# Altium PCB PCB.PcbDoc
Units mm, origin at the board's own origin, x right, y up, seen from the top; angles counter-clockwise.
Board outline 70 x 80 mm, 2 copper layers (Top Layer, Bottom Layer); 88 components, 64 nets, 298 pads, 158 vias.
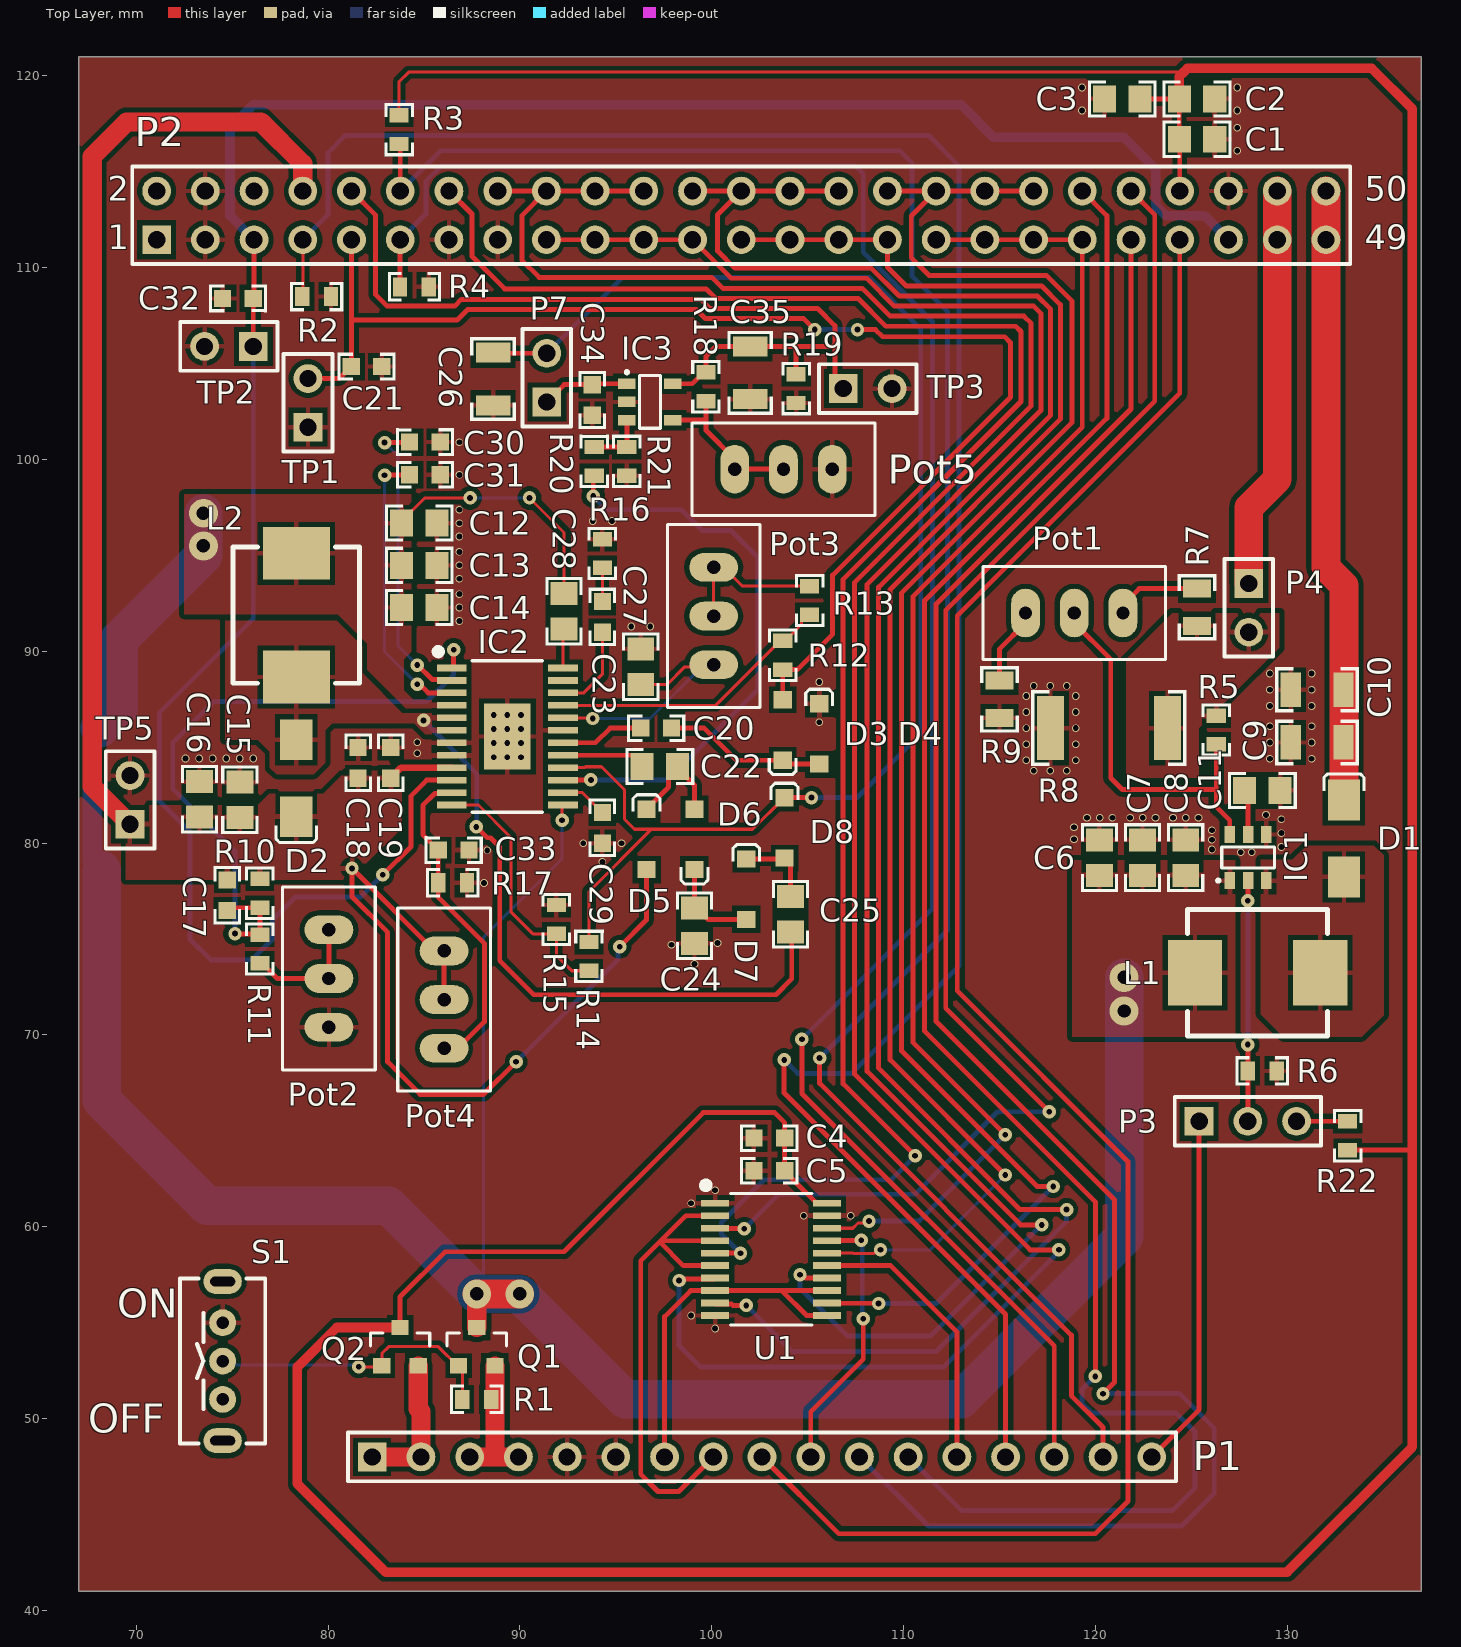
[diagram p0: Top Layer view]
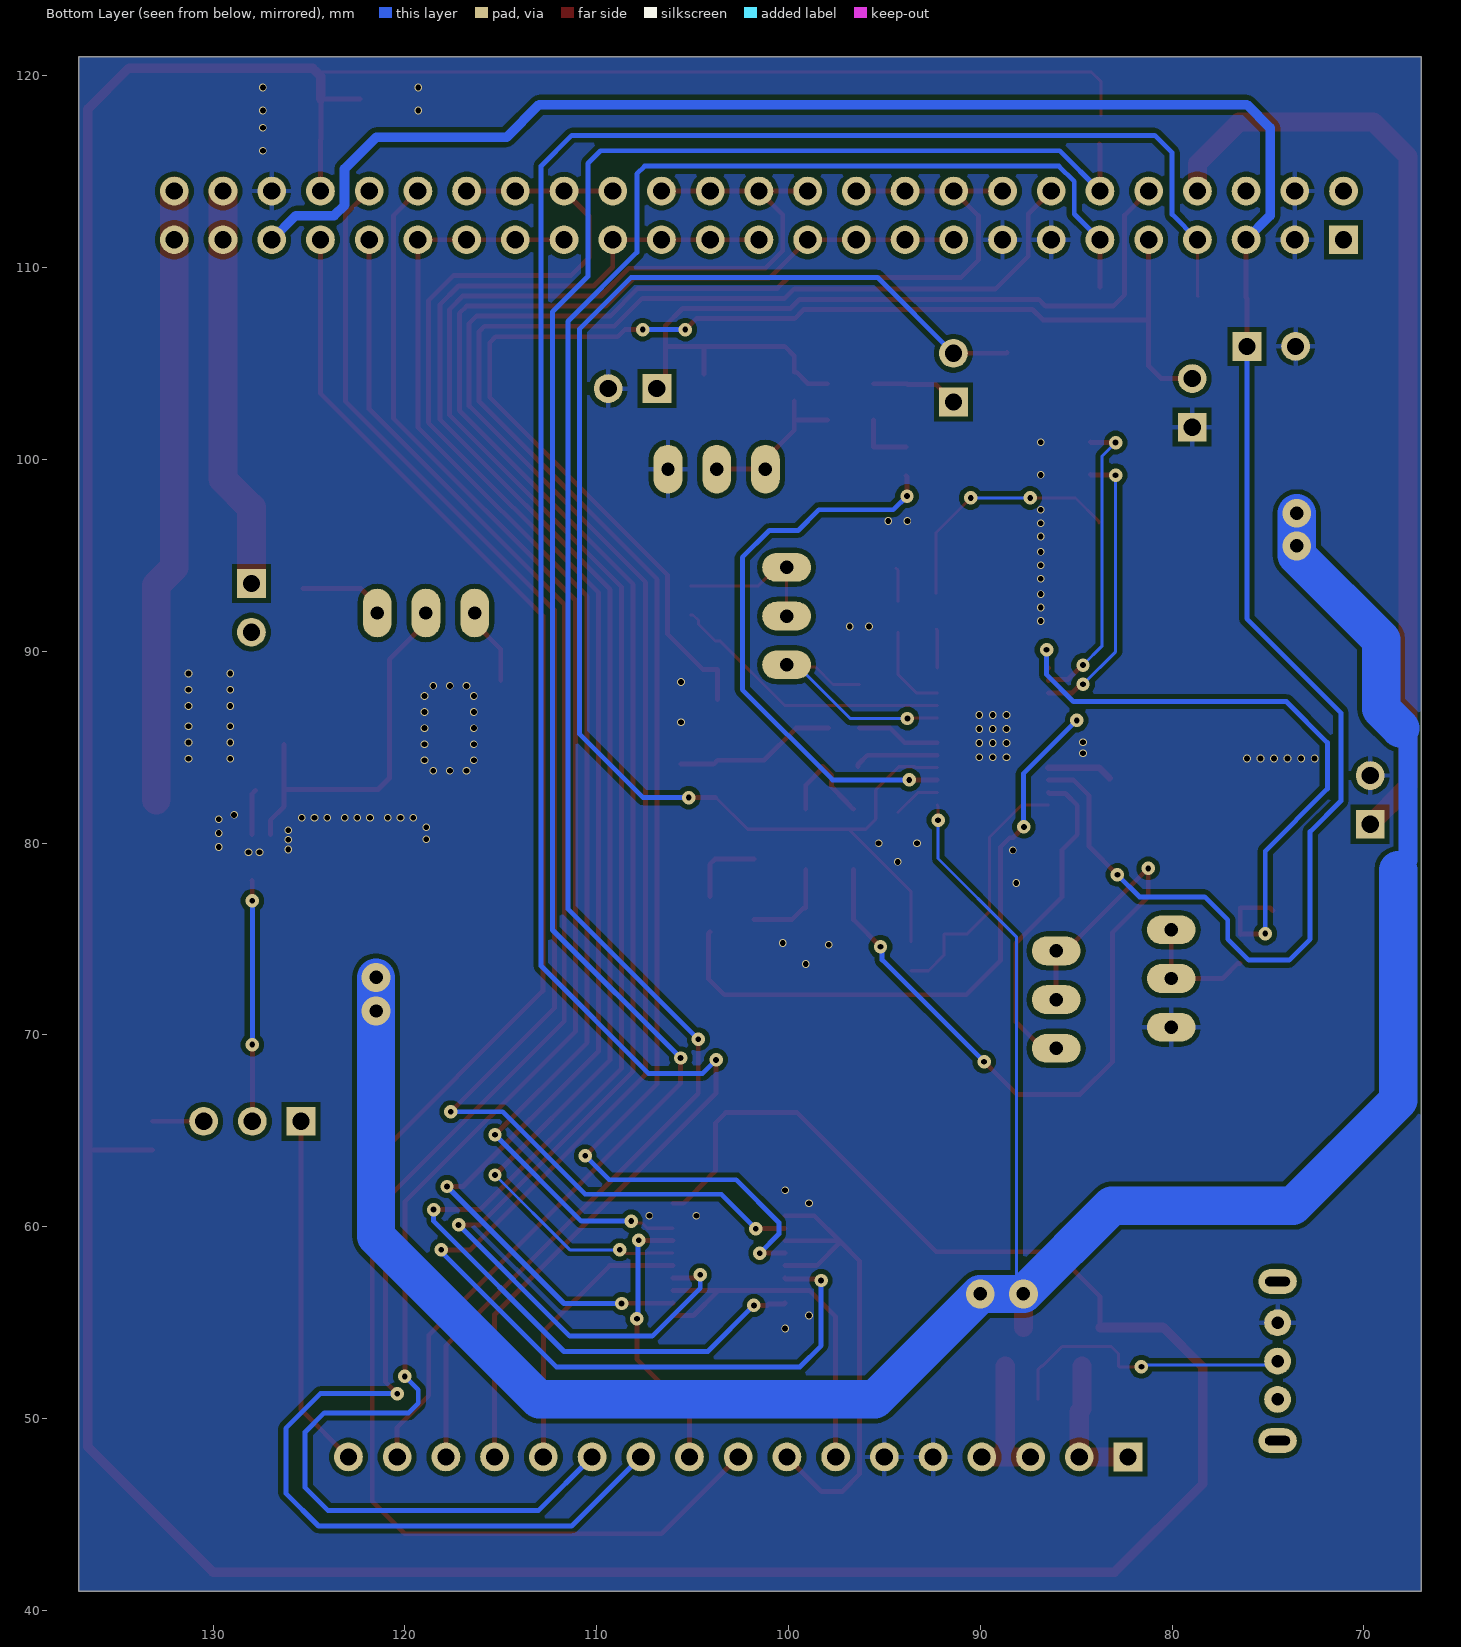
[diagram p1: Bottom Layer view, seen from below]
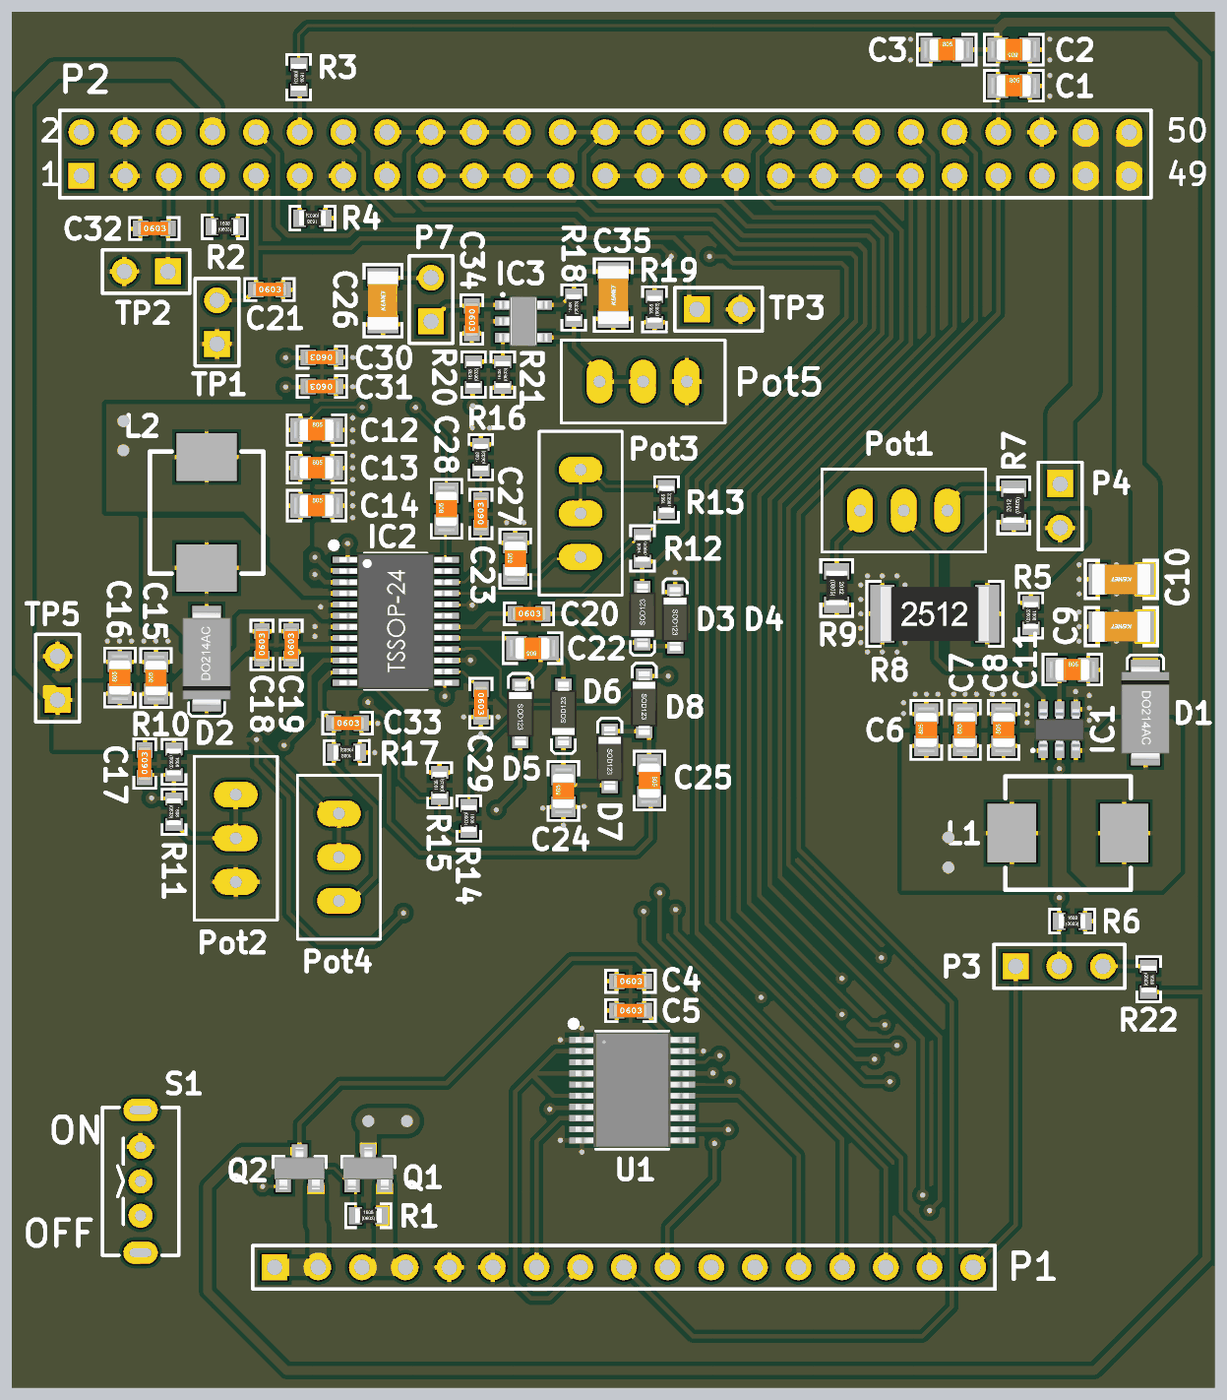
[diagram p2: 3D render of the assembled board from above, using the file's embedded part models]

## Layer stack, top to bottom
Top Solder: solder mask 0.0102, Solder Resist, Dk 3.5
Top Layer: signal copper 0.0356
Dielectric 1: dielectric 0.32, FR-4, Dk 4.8
Bottom Layer: signal copper 0.0356
Bottom Solder: solder mask 0.0102, Solder Resist, Dk 3.5

## Board outline
67,41 137,41 137,121 67,121

## Design rules (kind name [scope] priority, off if disabled: settings)
Clearance [All] p1: gap=0.254 ignorepadtopadclearanceinfootprint=FALSE
PolygonConnect [All] p1: connectstyle=Relief reliefconductorwidth=0.254 reliefentries=4 polygonreliefangle="90 Angle" airgapwidth=0.254
RoutingVias [All] p1: holewidth=0.3 width=0.7 viastyle="Through Hole" minholewidth=0.3 minwidth=0.4 maxholewidth=1.5 maxwidth=2
SolderMaskExpansion [All] p1: expansion=0.102 istentingtop=FALSE
SupplyNets "Schematic Supply Nets_5" [InNet('GND')] p1: voltage=0.000
SupplyNets "Schematic Supply Nets_4" [InNet('Vdd_5V_LCD')] p2: voltage=0.000
SupplyNets "Schematic Supply Nets_3" [InNet('Vdd_5V')] p3: voltage=0.000
SupplyNets "Schematic Supply Nets_1" [InNet('FPC_PIN7')] p4: voltage=0.000
SupplyNets "Schematic Supply Nets" [InNet('Vdd_3.3V')] p5: voltage=0.000
Width [All] p1: maxlimit=2.5 minlimit=0.16 preferedwidth=0.254
30 further rules are at their usual default settings.

## Classes and differential pairs
component class LCD_RGB_parallel_connector: C1 C2 C3 C4 C5 P1 P2 Q1 Q2 R1 R2 R3 R4 S1 U1
component class LCD_power_supplies: C12 C13 C14 C15 C16 C17 C18 C19 C20 C21 C22 C23 C24 C25 C26 C27 C28 C29 C30 C31 C32 C33 C34 C35 D2 D3 D4 D5 D6 D7 D8 IC2 IC3 L2 P7 Pot2 Pot3 Pot4 R10 R11 R12 R13 R14 R15 R16 R17 R18 R19 R20 R21 TP1 TP2 TP3 TP5
component class LCD_backlight_power: C6 C7 C8 C9 C10 C11 D1 IC1 L1 P3 P4 Pot1 R5 R6 R7 R8 R9 R22

## Components (designator, comment, footprint, x,y, rotation, side; value= is the part's Value field where it differs from the comment)
C1 "ceramic capacitor" "capacitor 0805" 125.3,116.7 r0 top value=100nF
C2 "ceramic capacitor" "capacitor 0805" 125.3,118.8 r180 top value=22uF
C3 "ceramic capacitor" "capacitor 0805" 121.4,118.8 r0 top value=22uF
C4 "ceramic capacitor" "capacitor 0603" 103,64.625 r0 top value=10uF
C5 "Ceramic capacitor" "capacitor 0603" 103,62.925 r0 top value=100nF
C6 "ceramic capacitor" "capacitor 0805" 120.21,79.25 r90 top value=10uF
C7 "ceramic capacitor" "capacitor 0805" 122.46,79.25 r90 top value=10uF
C8 "ceramic capacitor" "capacitor 0805" 124.71,79.25 r90 top value=100nF
C9 "ceramic capacitor" "capacitor 1206" 131.56,85.25 r180 top value=4.7uF
C10 "ceramic capacitor" "capacitor 1206" 131.56,88 r180 top value=4.7uF
C11 "ceramic capacitor" "capacitor 0805" 128.71,82.75 r0 top value=220nF
C12 "ceramic capacitor" "capacitor 0805" 84.744,96.686 r0 top value=22uF
C13 "ceramic capacitor" "capacitor 0805" 84.744,94.486 r0 top value=22uF
C14 "ceramic capacitor" "capacitor 0805" 84.744,92.286 r0 top value=100nF
C15 "ceramic capacitor" "capacitor 0805" 75.398,82.265 r90 top value=22uF
C16 "ceramic capacitor" "capacitor 0805" 73.298,82.29 r90 top value=22uF
C17 "ceramic capacitor" "capacitor 0603" 74.744,77.286 r90 top value=270pF
C18 "ceramic capacitor" "capacitor 0603" 81.563,84.19 r90 top value=1uF
C19 "ceramic capacitor" "capacitor 0603" 83.263,84.19 r90 top value=100nF
C20 "ceramic capacitor" "capacitor 0603" 97.1,86 r0 top value=470nF
C21 "ceramic capacitor" "capacitor 0603" 82,104.85 r0 top value=2.2uF
C22 "ceramic capacitor" "capacitor 0805" 97.3,84 r180 top value=1uF
C23 "ceramic capacitor" "capacitor 0805" 96.3,89.2 r90 top value=220nF
C24 "ceramic capacitor" "capacitor 0805" 99.1,75.7 r90 top value=2.2uF
C25 "ceramic capacitor" "capacitor 0805" 104.1,76.3 r270 top value=1uF
C26 "ceramic capacitor" "capacitor 1206" 88.6,104.2 r90 top value=4.7uF
C27 "ceramic capacitor" "capacitor 0603" 94.3,91.8 r90 top value=2.2nF
C28 "ceramic capacitor" "capacitor 0805" 92.3,92.1 r90 top value=220nF
C29 "ceramic capacitor" "capacitor 0603" 94.3,80.8 r270 top value=22pF
C30 "ceramic capacitor" "capacitor 0603" 85.048,100.913 r180 top value=22nF
C31 "ceramic capacitor" "capacitor 0603" 85.048,99.213 r180 top value=22nF
C32 "ceramic capacitor" "capacitor 0603" 75.3,108.4 r0 top value=2.2uF
C33 "ceramic capacitor" "capacitor 0603" 86.544,79.64 r0 top value=100nF
C34 "ceramic capacitor" "capacitor 0603" 93.773,103.104 r270 top value=100nF
C35 "ceramic capacitor" "capacitor 1206" 102,104.525 r90 top value=4.7uF
D1 "D Schottky" DO-214AC 132.96,80.25 r270 top
D2 "D Schottky" DO-214AC 78.344,83.386 r90 top
D3 "D Schottky" SOD123 103.7,85.9 r90 top
D4 "D Schottky" SOD123 105.6,85.7 r270 top
D5 "D Schottky" SOD123 96.6,80.2 r270 top
D6 "D Schottky" SOD123 99.1,80.2 r90 top
D7 "D Schottky" SOD123 101.8,77.6 r270 top
D8 "D Schottky" SOD123 103.8,80.8 r270 top
IC1 "TPS61165" "sot-23 (6)" 127.96,79.25 r270 top
IC2 "TPS65150" TSSOP24-Thermal_pad 86.444,81.986 r0 top
IC3 "MIC5235YM5" "sot-23 (5)" 96.773,103.004 r180 top
L1 "Inductor" "Inductor SMD 6.6 x 7.3 x 4" 128.46,73.25 r0 top value=22uH
L2 "Inductor" "Inductor SMD 6.6 x 7.1 x 3" 78.344,91.886 r270 top value=4.7uH
P1 "Header 17" HDR1X17 82.3,48 r0 top
P2 "Header 25X2" HDR2X25 71.06,111.46 r0 top
P3 "Header 3" HDR1X3 125.41,65.5 r0 top
P4 "Header 2" HDR1X2 128,93.54 r270 top
P7 "Header 2" HDR1X2 91.4,103 r90 top
Pot1 "Multiturn" "trim pot 3296W" 118.9,92 r180 top value=1k
Pot2 "Multiturn" "trim pot 3296W" 80.044,72.946 r90 top value=5k
Pot3 "Multiturn" "trim pot 3296W" 100.1,91.84 r90 top value=50k
Pot4 "Multiturn" "trim pot 3296W" 86.044,71.846 r90 top value=100k
Pot5 "Multiturn" "trim pot 3296W" 103.74,99.5 r180 top value=20k
Q1 "SI2301" sot-23 87.75,53.75 r270 top
Q2 "SI2301" sot-23 83.75,53.75 r270 top
R1 "Resistor" "resistor 0603" 87.75,51 r0 top value=100k
R2 "Resistor" "resistor 0603" 79.4,108.5 r0 top value=10k
R3 "Resistor" "resistor 0603" 83.7,117.2 r270 top value=10k
R4 "Resistor" "resistor 0603" 84.5,109 r180 top value=10k
R5 "Resistor" "resistor 0603" 126.3,85.9 r270 top value=5.6k
R6 "Resistor" "resistor 0603" 128.7,68.125 r0 top value=100k
R7 "Resistor" "resistor 0805" 125.3,92.3 r90 top value=120
R8 "Resistor" "resistor 2512" 120.71,86 r0 top value=2.2
R9 "Resistor" "resistor 0805" 115,87.5 r270 top value=330
R10 "Resistor" "resistor 0603" 76.444,77.386 r270 top value=56K
R11 "Resistor" "resistor 0603" 76.444,74.486 r270 top value=4.7K
R12 "Resistor" "resistor 0603" 103.7,89.8 r90 top value=390k
R13 "Resistor" "resistor 0603" 105.1,92.65 r90 top value=56k
R14 "Resistor" "resistor 0603" 93.6,74.1 r270 top value=820k
R15 "Resistor" "resistor 0603" 91.9,76.025 r90 top value=47k
R16 "Resistor" "resistor 0603" 94.3,95.1 r90 top value=0
R17 "Resistor" "resistor 0603" 86.494,77.94 r180 top value=39k
R18 "Resistor" "resistor 0603" 99.7,103.8 r90 top value=120k
R19 "Resistor" "resistor 0603" 104.4,103.7 r90 top value=47k
R20 "Resistor" "resistor 0603" 93.873,99.904 r90 top value=1k
R21 "Resistor" "resistor 0603" 95.573,99.904 r90 top value=100k
R22 "Resistor" "resistor 0603" 133.15,64.75 r270 top value=1k
S1 "SW-SPDT" "Slide switch 2mm pitch" 74.5,53 r90 top
TP1 "Header 2" HDR1X2 78.95,101.685 r90 top
TP2 "Header 2" HDR1X2 76.1,105.9 r180 top
TP3 "Header 2" HDR1X2 106.86,103.7 r0 top
TP5 "Header 2" HDR1X2 69.673,80.987 r90 top
U1 "SN74LVC244APWR" PW20 103.1,58.3 r0 top

## Footprints (in the part's own frame and the unit in brackets; to place one, negate y for a bottom-side part, rotate by r counter-clockwise, add the part's x,y. Pads: shape width x height; smd on the part's side, far side on the other; paste and mask are expansions set on the pad)
"capacitor 0603" [mm] "capacitor 0603 1.6mm x 0.8mm"
  rect 0.9x0.9 smd: 1(-0.8,0) 2(0.8,0)
  silkscreen extent -1.52,-0.72 1.52,0.72, body extent -1,-0.39 1,0.39, height 0.8
"capacitor 0805" [mm] "capacitor 0805 2mm x 1.25mm"
  rect 1.2x1.4 smd: 1(-0.925,0) 2(0.925,0)
  silkscreen extent -1.79,-0.97 1.79,0.97, body extent -1.3,-0.62 1.3,0.63, height 0.78
"capacitor 1206" [mm] "capacitor SMD 1206 3.2mm x 1.6mm"
  rect 1.05x1.8 smd: 1(-1.375,0) 2(1.375,0)
  silkscreen extent -2.19,-1.19 2.19,1.19, body extent -1.69,-0.9 1.71,0.9, height 0.88
DO-214AC [mm] "DO-214AC 4.5mm x 2.8mm"
  rect 2.13x1.68 smd: 1(2.005,0) 2(-2.005,0)
  silkscreen extent -3.35,-1.13 -2.47,1.13, body extent -2.74,-1.4 2.74,1.4, height 2.26
HDR1X2 [mm] "Connector; Header; 2 Position"
  rect 1.5x1.5 hole 0.9: 1(0,0)
  round 1.5 hole 0.9: 2(2.54,0)
  silkscreen extent -1.27,-1.27 3.81,1.27
HDR1X3 [mm] "Connector; Header; 3 Position"
  rect 1.5x1.5 hole 0.9: 1(0,0)
  round 1.5 hole 0.9: 2(2.54,0) 3(5.08,0)
  silkscreen extent -1.27,-1.27 6.35,1.27
HDR1X17 [mm] "Connector; Header; 17 Position"
  rect 1.5x1.5 hole 0.9: 1(0,0)
  round 1.5 hole 0.9: 2(2.54,0) 3(5.08,0) 4(7.62,0) 5(10.16,0) 6(12.7,0) 7(15.24,0) 8(17.78,0) 9(20.32,0) 10(22.86,0) 11(25.4,0) 12(27.94,0) 13(30.48,0) 14(33.02,0) 15(35.56,0) 16(38.1,0) 17(40.64,0)
  silkscreen extent -1.27,-1.27 41.91,1.27
HDR2X25 [mm] "Connector; Header; 25x2 Position"
  rect 1.5x1.5 hole 0.9: 1(0,0)
  round 1.5 hole 0.9: 2(0,2.54) 3(2.54,0) 4(2.54,2.54) 5(5.08,0) 6(5.08,2.54) 7(7.62,0) 8(7.62,2.54) 9(10.16,0) 10(10.16,2.54) 11(12.7,0) 12(12.7,2.54) 13(15.24,0) 14(15.24,2.54) 15(17.78,0) 16(17.78,2.54) 17(20.32,0) 18(20.32,2.54) 19(22.86,0) 20(22.86,2.54) 21(25.4,0) 22(25.4,2.54) 23(27.94,0) 24(27.94,2.54) 25(30.48,0) 26(30.48,2.54) 27(33.02,0) 28(33.02,2.54) 29(35.56,0) 30(35.56,2.54) 31(38.1,0) 32(38.1,2.54) 33(40.64,0) 34(40.64,2.54) 35(43.18,0) 36(43.18,2.54) 37(45.72,0) 38(45.72,2.54) 39(48.26,0) 40(48.26,2.54) 41(50.8,0) 42(50.8,2.54) 43(53.34,0) 44(53.34,2.54) 45(55.88,0) 46(55.88,2.54) 47(58.42,0) 48(58.42,2.54) 49(60.96,0) 50(60.96,2.54)
  silkscreen extent -1.27,-1.27 62.23,3.81
"Inductor SMD 6.6 x 7.1 x 3" [mm] "6.6mm x 7.1mm x 3mm"
  rect 2.75x3.5 smd: 1(-3.225,0) 2(3.225,0)
  silkscreen extent -3.55,-3.3 3.55,3.3, body extent -3.55,-3.3 3.55,3.3, height 3
"Inductor SMD 6.6 x 7.3 x 4" [mm] "6.6mm x 7.3mm x 4mm"
  rect 2.83x3.4 smd: 1(-3.265,0) 2(3.265,0)
  silkscreen extent -3.65,-3.3 3.65,3.3, body extent -3.65,-3.3 3.65,3.3, height 3
PW20 [mm]
  rect 1.462x0.355 smd paste+0 mask+0: 1(-2.921,2.925) 2(-2.921,2.275) 3(-2.921,1.625) 4(-2.921,0.975) 5(-2.921,0.325) 6(-2.921,-0.325) 7(-2.921,-0.975) 8(-2.921,-1.625) 9(-2.921,-2.275) 10(-2.921,-2.925) 11(2.921,-2.925) 12(2.921,-2.275) 13(2.921,-1.625) 14(2.921,-0.975) 15(2.921,-0.325) 16(2.921,0.325) 17(2.921,0.975) 18(2.921,1.625) 19(2.921,2.275) 20(2.921,2.925)
  silkscreen extent -3.51,-3.43 2.13,3.96, body extent -3.3,-3.3 3.3,3.3, height 1.2
"resistor 0603" [mm] "resistor SMD 0.0625W 0603 1.6mm x 0.8mm"
  rect 0.75x1 smd: 1(-0.75,0) 2(0.75,0)
  silkscreen extent -1.39,-0.77 1.39,0.77, body extent -0.77,-0.42 0.78,0.43, height 0.45
"resistor 0805" [mm] "resistor SMD 0.1W 0805 2mm x 1.25mm"
  rect 0.95x1.45 smd: 1(-0.975,0) 2(0.975,0)
  silkscreen extent -1.74,-1.01 1.74,1.01, body extent -1,-0.62 1,0.63, height 0.45
"resistor 2512" [mm] "resistor SMD 2512 6.35mm x 3.1mm"
  rect 1.4x3.35 smd: 1(-3.05,0) 2(3.05,0)
  silkscreen extent -4.06,-1.98 4.05,1.98, body extent -3.15,-1.57 3.15,1.58, height 0.82
"Slide switch 2mm pitch" [mm] "slide switch 3 pins, 2mm pitch"
  round 1.4 / inner round 1.7 / far side round 1.4 hole 0.65: 1(-2,0) 2(0,0) 3(2,0)
  oval 1.3x2 hole 0.5 slot 1.3 at 90 deg: ""(-4.15,0) ""(4.15,0)
  silkscreen extent -4.3,-2.22 4.3,2.22
SOD123 [mm] "SOD123"
  rect 0.9x0.95 smd: 1(1.575,0) 2(-1.575,0)
  silkscreen extent -2.33,-0.78 -1.45,0.78, body extent -1.85,-0.77 1.85,0.77, height 1.35
sot-23 [mm] "sot-23"
  rect 0.8x0.9 smd: 1(1,-0.95) 2(1,0.95) 3(-1,0)
  silkscreen extent -0.71,-1.55 -0.05,1.55, body extent -1.21,-1.45 1.21,1.45, height 0.98
"sot-23 (5)" [mm] "sot-23 (5)"
  rect 0.9x0.55 smd: 1(1.2,-0.95) 2(1.2,0) 3(1.2,0.95) 4(-1.2,0.95) 5(-1.2,-0.95)
  silkscreen extent -0.55,-1.6 1.25,1.37, body extent -1.4,-1.45 1.4,1.45, height 1.1
"sot-23 (6)" [mm] "sot-23 (6)"
  rect 0.9x0.55 smd: 1(1.2,-0.95) 2(1.2,0) 3(1.2,0.95) 4(-1.2,0.95) 5(-1.2,0) 6(-1.2,-0.95)
  silkscreen extent -0.55,-1.6 1.25,1.37, body extent -1.2,-1.45 1.2,1.45, height 1.08
"trim pot 3296W" [mm] "9.6 x 9.6mm"
  oval 1.5x2.54 hole 0.7: 1(-2.54,0) 2(0,0) 3(2.54,0)
  silkscreen extent -4.76,-2.41 4.76,2.41
TSSOP24-Thermal_pad [mm] "TSSOP24 with thermal pad"
  rect 1.55x0.35 smd: 1(0,7.15) 2(0,6.5) 3(0,5.85) 4(0,5.2) 5(0,4.55) 6(0,3.9) 7(0,3.25) 8(0,2.6) 9(0,1.95) 10(0,1.3) 11(0,0.65) 12(0,0) 13(5.8,0) 14(5.8,0.65) 15(5.8,1.3) 16(5.8,1.95) 17(5.8,2.6) 18(5.8,3.25) 19(5.8,3.9) 20(5.8,4.55) 21(5.8,5.2) 22(5.8,5.85) 23(5.8,6.5) 24(5.8,7.15)
  rect 2.44x3.42 smd: 25(2.9,3.575)
  silkscreen extent -0.87,-0.38 4.72,8.17, body extent -0.38,-0.37 6.18,7.53, height 1.19

## Part data
C1 C8 C14: "Multilayer ceramic capacitor", LCSC part=C1711, Package=0805, V=50
  C8 C14: Material=X7R
C2 C3: "Multilayer ceramic capacitor", LCSC part=C45783, Package=0805, V=25
C4: "Multilayer ceramic capacitor", LCSC part=C1691, Package=0603, V=6.3
C5: "Multilayer ceramic capacitor", LCSC part=C14663, Package=0603, V=50
C6 C7: "Multilayer ceramic capacitor", LCSC part=C15850, Package=0805, Material=X5R, V=25
C9 C10: "Multilayer ceramic capacitor", LCSC part=C51205, Package=1206, Material=X7R, V=50V
C11 C23 C28: "Multilayer ceramic capacitor", LCSC part=C5153, Package=0805, Material=X7R
  C11: V=25
  C23 C28: V=25V
C12 C13 C15 C16: "Multilayer ceramic capacitor", LCSC part=C602037, Package=0805, Material=X5R, V=25
C17: "Multilayer ceramic capacitor", LCSC part=C472789, Package=0603, Material=C0G, V=50V
C18: "Multilayer ceramic capacitor", LCSC part=C29936, Package=0603, Material=X7R, V=25
C19 C33 C34: "Multilayer ceramic capacitor", LCSC part=C1591, Package=0603, Material=X7R, V=50
C20: "Multilayer ceramic capacitor", LCSC part=C472773, Package=0603, Material=X7R, V=25V
C21 C32: "Multilayer ceramic capacitor", LCSC part=C57895, Package=0603, Material=X5R, V=25V
C22 C25: "Multilayer ceramic capacitor", LCSC part=C77083, Package=0805, Material=X7R, V=50V
C24: "Multilayer ceramic capacitor", LCSC part=C2762602, Package=0805, Material=X7R, V=50V
C26 C35: "Multilayer ceramic capacitor", LCSC part=C307575, Package=1206, Material=X7R, V=50V
C27: "Multilayer ceramic capacitor", LCSC part=C343869, Package=0603, Material=C0G, V=50V
C29: "Multilayer ceramic capacitor", LCSC part=C1653, Package=0603, Material=C0G, V=50V
C30 C31: "Multilayer ceramic capacitor", LCSC part=C21122, Package=0603, Material=X7R, V=50V
D1 D2: "Schottky Diode", current=2A, LCSC part=C511359, MFR="Vishay Intertech", MFR part=SS26SHE3_B/H, Package=SMA(DO-214AC), voltage=60V
D3 D4 D5 D6 D7 D8: "Schottky Diode", current=500mA, LCSC part=C21353, MFR=onsemi, MFR part=MBR0540T1G, Package=SOD-123, voltage=40V
IC1: "LED Backlighting for LCD display", LCSC part=C58756, MFR="Texas Instruments", MFR part=TPS61165DBVR, Package=SOT-23-6
IC2: "LCD Power Supply"
IC3: "Ultra-Low Quiescent Current, 150mA μCap LDO Regulator."
L1: LCSC part=C54431705, Max. DC Resistance=190mOhm, MFR=YOUCHI, MFR part=HCMA-0630-220-M-K, Package=SMD,7.3x6.6mm, Irms=2A, Isat=2.5A
L2: LCSC part=C41384284, Max. DC Resistance=33mOhm, MFR=Magnetsyc, MFR part=FSA0630-4R7MT, Package=SMD,7x6.6mm, Irms=5A, Isat=7.2A
P1: "Header, 17-Pin", LatestRevisionDate=17-Jul-2002, LatestRevisionNote="Re-released for DXP Platform.", Publisher="Altium Limited"
P2: "Header, 25-Pin, Dual row", LatestRevisionDate=17-Jul-2002, LatestRevisionNote="Re-released for DXP Platform.", Publisher="Altium Limited"
P3: "Header, 3-Pin", LatestRevisionDate=17-Jul-2002, LatestRevisionNote="Re-released for DXP Platform.", Publisher="Altium Limited"
P4 P7 TP1 TP2 TP3 TP5: "Header, 2-Pin", LatestRevisionDate=17-Jul-2002, LatestRevisionNote="Re-released for DXP Platform.", Publisher="Altium Limited"
Pot1 Pot2 Pot3 Pot4 Pot5: library part "RPot SM", "Square Trimming Potentiometer", ComponentLink1Description="Manufacturer Link", ComponentLink1URL=http://bourns.com/2/search.html
Q1 Q2: library part MOSFET-P, "P-Channel MOSFET", LCSC part=C10487, MFR="Vishay Intertech", MFR part=SI2301CDS-T1-GE3, Package=SOT-23
R1 R2 R3 R4 R5 R6 R10 R11 R12 R13 R14 R15 R16 R17 R18 R19 R20 R21 R22: Package=0603
R7 R9: Package=0805
R8: LCSC part=C55586149, Package=2512
S1: "SPDT Subminiature Toggle Switch, Right Angle Mounting, Vertical Actuation", ComponentLink1Description="Manufacturer Link", ComponentLink1URL=http://www.apem.com, DatasheetVersion=05-Dec-2000, LatestRevisionDate=17-Dec-2003, LatestRevisionNote="Schematic revised, PCB Footprint replaced.", PackageDescription="Switch; 4 Leads", PackageReference=TL36WW15050, Published=24-Mar-1999, Publisher="Altium Limited"
U1: "8-ch, 1.65-V to 3.6-V buffers with 3-state outputs 20-TSSOP -40 to 125", Manufacturer_Name="Texas Instruments", Copyright="Copyright (C) 2026 Ultra Librarian. All rights reserved.", Datasheet=https://www.ti.com/lit/gpn/sn74lvc244a, Manufacturer_Part_Number=SN74LVC244APWR, RefDes=RefDes, Type=Type

## Via types
v1: diameter 0.4, hole 0.3, Top Layer to Bottom Layer, tented both sides, 93 vias
v2: diameter 0.7, hole 0.3, Top Layer to Bottom Layer, tented both sides, 47 vias
v3: diameter 0.4, hole 0.3, Top Layer to Bottom Layer, 12 vias
v4: diameter 1.5, hole 0.7, Top Layer to Bottom Layer, tented both sides, 6 vias

## Nets (pads, with @x,y where several pads share a name; then routed paths per layer and width w, separated by ;. In a path a pad name is that pad's centre, name@x,y a point inside that pad or via, vN(x,y) a via of type N, cw(c..) or ccw(c..) an arc to the next point about the centre after c; other vN are vias at no path point)
AVDD_9.6V-FPC_PIN43: C15.1 C16.1 C17.2 C18.1 C19.1 D2.2 D5.1 IC2.9 P2.8 Pot4.2 Pot4.3 R10.1 TP5.1 | length 94
  Top Layer w0.254: Pot4.2 Pot4.3 85.544,74.386 v2(81.244,78.686) 81.244,77.211 83.1,75.354 83.1,68.6 84.8,66.9 88.1,66.9 v2(89.8,68.6) ; v2(95.2,74.6) 96.6,76 D5.1
  Top Layer w0.35: C19.1 83.809,83.936 IC2.9
  Top Layer w1: TP5.1 67.7,82.96 67.7,115.8 69.5,117.6 76.5,117.6 78.68,115.42 P2.8
  Bottom Layer w0.254: v2(89.8,68.6) 95.115,73.915 95.115,74.515 v2(95.2,74.6)
EN_LDO: IC2.15 R20.1 | length 30
  Top Layer w0.254: IC2.15@92.244,83.286 92.251,83.293 93.693,83.293 v2(93.7,83.3) ; v2(93.82,98.096) 93.82,99.101 R20.1
  Bottom Layer w0.254: v2(93.7,83.3) 97.7,83.3 102.4,88 102.4,94.9 101,96.3 99.5,96.3 98.419,97.381 94.535,97.381 v2(93.82,98.096)
FPC_PIN7: C1.1 C2.2 C3.2 C4.2 C5.2 P2.44 Q2.3 R3.1 R22.2 U1.20 | length 243.5
  Top Layer w0.16: R3.1 83.7,119.7 84.2,120.2 124.575,120.2 124.588,120.188
  Top Layer w0.254: Q2.3 83.75,56.35 86.1,58.7 92.3,58.7 99.55,65.95 103.275,65.95 103.8,65.425 C4.2 C5.2 104.123,62.602 104.123,62.569 105.467,61.225 U1.20 ; C3.2 C2.2 C1.1 124.4,116.675 P2.44 ; R22.2 136.524,64
  Top Layer w0.5: Q2.3 80.45,54.75 78.4,52.7 78.4,46.6 83,42 130,42 136.524,48.524 136.524,64 136.524,118.276 134.4,120.4 124.8,120.4 124.588,120.188 124.375,119.975 C2.2
FPC_PIN12: P2.33 P2.35 P2.37 P2.39 U1.18 | length 71.2
  Top Layer w0.16: U1.18 107.355,59.925 107.627,60.197 108.097,60.197 v2(108.2,60.3)
  Top Layer w0.254: P2.33 P2.35 P2.37 P2.39 119.32,101.695 110.5,92.875 110.5,69.6 v2(115.3,64.8)
  Bottom Layer w0.254: v2(108.2,60.3) 110.8,60.3 v2(115.3,64.8)
FPC_PIN13: P2.32 P2.34 P2.36 P2.38 U1.12 | length 88.9
  Top Layer w0.254: U1.12 106.034,56.012 108.688,56.012 v2(108.7,56) ; P2.32 P2.34 ; P2.38 P2.36 P2.34 ; v2(117.8,62.1) 116.966,62.1 109.9,69.166 109.9,93.05 118.775,101.925 118.775,108.275 117.45,109.6 111.325,109.6 110.4,110.525 110.4,112.7 P2.34
  Bottom Layer w0.254: v2(108.7,56) 111.7,56 v2(117.8,62.1)
FPC_PIN20: P2.25 P2.27 P2.29 P2.31 U1.16 | length 81.4
  Top Layer w0.16: U1.16 107.373,58.625 107.382,58.616 108.47,58.616 108.654,58.8 v2(108.8,58.8)
  Top Layer w0.254: P2.25 P2.27 P2.29 P2.31 109.16,110.04 110.15,109.05 117.2,109.05 118.175,108.075 118.175,102.1 109.3,93.225 109.3,93.1 ; 109.3,93.105 109.3,68.7 v2(115.3,62.7)
  Bottom Layer w0.16: v2(108.8,58.8) 111.4,58.8 v2(115.3,62.7)
FPC_PIN21: P2.24 P2.26 P2.28 P2.30 U1.9 | length 108.8
  Top Layer w0.254: P2.24 P2.26 ; U1.9 100.229,55.975 101.027,55.975 101.101,55.901 v2@101.799,55.901 ; P2.30 P2.28 P2.26 ; 108.7,93.25 108.7,93.35 117.667,102.317 117.667,107.833 116.975,108.525 109.775,108.525 108.325,109.975 101.203,109.975 100.3,110.878 100.3,112.76 P2.26 ; 108.7,93.255 108.7,68.266 116.066,60.9 v2(118.5,60.9)
  Bottom Layer w0.254: v2(101.8,55.9) 104.2,53.5 111.7,53.5 118.5,60.3 v2(118.5,60.9)
FPC_PIN28: P2.17 P2.19 P2.21 P2.23 U1.14 | length 101.3
  Top Layer w0.254: P2.17 P2.19 P2.21 P2.23 101.01,109.45 108.075,109.45 109.525,108 116.782,108 117.159,107.623 117.159,102.559 108.1,93.5 108.1,93.375 ; v2(104.6,57.5) 104.721,57.5 104.896,57.325 U1.14 ; 108.1,93.38 108.1,68.1 116.1,60.1 v2(117.2,60.1)
  Bottom Layer w0.254: v2(104.6,57.5) 104.6,56.8 107.1,54.3 111.4,54.3 v2(117.2,60.1)
FPC_PIN29: P2.16 P2.18 P2.20 P2.22 U1.7 | length 125.2
  Top Layer w0.254: P2.16 P2.18 ; P2.22 P2.20 P2.18 ; v2(98.3,57.2) 98.375,57.275 100.129,57.275 U1.7 ; 107.45,93.55 107.45,93.6 116.651,102.801 116.651,107.1 116.276,107.475 109.3,107.475 107.85,108.925 100.575,108.925 100,109.5 91,109.5 90.1,110.4 90.1,112.72 P2.18 ; 107.45,93.555 107.45,67.95 116.6,58.8 v2(118.1,58.8)
  Bottom Layer w0.254: v2(98.3,57.2) 98.3,53.8 99.4,52.7 112.1,52.7 v2@118.15,58.75
GND: C1.2 C2.1 C3.1 C4.1 C5.1 C6.2 C7.2 C8.2 C9.2 C10.2 C11.2 C12.2 C13.2 C14.2 C15.2 C16.2 C18.2 C19.2 C21.2 C23.2 C24.1 C26.1 C29.2 C30.1 C31.1 C32.1 C33.2 C34.2 C35.1 D4.2 IC1.4 IC2.7 IC2.8 IC2.19 IC2.25 IC3.2 P1.5 P1.6 P2.3 P2.4 P2.13 P2.15 P2.46 Pot2.1 Pot5.1 R2.2 R4.1 R6.2 R8.1 R9.2 R15.2 R16.2 R17.1 R19.1 R21.1 S1.3 TP1.1 TP2.2 TP3.2 TP5.2 U1.1 U1.10 U1.19
  other v1: 100.175,54.7 98.925,55.375 104.8,60.575 107.25,60.575 98.925,61.225 100.175,61.9 99.1,73.7 97.9,74.7 100.3,74.8 88.125,77.925 94.3,79.025 127.575,79.525 128.15,79.525 88.3,79.625 126.075,79.675 129.7,79.8 93.3,80 95.3,80 126.075,80.175 118.887,80.2 129.7,80.525 126.075,80.675 118.887,80.825 129.7,81.25 119.563,81.325 120.225,81.325 120.887,81.325 121.813,81.325 122.475,81.325 123.137,81.325 124.05,81.325 124.712,81.325 125.375,81.325 128.9,81.475 116.788,83.775 117.65,83.775 118.513,83.775 116.4,84.325 118.975,84.325 72.569,84.411 73.274,84.411 73.979,84.411 74.684,84.411 75.389,84.411 76.094,84.411 129.1,84.4 131.275,84.4 84.644,84.686 116.4,85.163 118.975,85.163 129.1,85.25 131.275,85.25 84.644,85.261 116.4,86 118.975,86 129.1,86.1 131.275,86.1 105.6,86.3 116.4,86.837 118.975,86.837 129.1,87.15 131.275,87.15 116.4,87.675 118.975,87.675 129.1,88 131.275,88 116.788,88.2 117.65,88.2 118.513,88.2 105.6,88.4 129.1,88.85 131.275,88.85 95.8,91.3 96.8,91.3 86.844,91.586 86.844,92.286 86.844,92.986 86.844,93.786 86.844,94.486 86.844,95.186 86.844,95.986 86.844,96.686 93.8,96.8 94.8,96.8 86.844,97.386 86.844,99.2 86.844,100.9 127.4,116.1 127.4,117.3 119.3,118.2 127.4,118.2 119.3,119.4 127.4,119.4
  other v3: 88.632,84.486 89.344,84.486 90.057,84.486 88.632,85.219 89.344,85.219 90.057,85.219 88.632,85.953 89.344,85.953 90.057,85.953 88.632,86.686 89.344,86.686 90.057,86.686
LCD_BACKLIGHT_PWM: P1.17 P3.1 | length 18.5
  Top Layer w0.254: P1.17 125.41,50.47 P3.1
LCD_BLUE_BIT6: P1.7 U1.8 U1.11 U1.13 | length 19.3
  Top Layer w0.254: P1.7 97.54,55.315 98.9,56.675 U1.8 103.65,56.675 ; U1.11 104.95,55.375 103.65,56.675 ; U1.13 103.65,56.675
LCD_BLUE_BIT7: P1.8 U1.2 U1.4 U1.6 | length 27.2
  Top Layer w0.254: P1.8 98.28,46.2 97.2,46.2 96.3,47.1 96.3,58.225 97.288,59.213 ; U1.6 98.525,57.975 97.288,59.213 ; U1.4 97.35,59.275 97.288,59.213 ; U1.2 98.65,60.575 97.288,59.213
LCD_DE-FPC_PIN9: P1.10 U1.17 | length 14.3
  Top Layer w0.254: P1.10 105.16,50.36 107.9,53.1 v2(107.9,55.2) ; U1.17 106.034,59.288 107.788,59.288 v2(107.8,59.3)
  Bottom Layer w0.254: v2(107.8,59.3) 107.85,59.25 107.85,55.25 v2(107.9,55.2)
LCD_DE-FPC_PIN9_CONN: P2.42 U1.3 | length 75.2
  Top Layer w0.254: U1.3 100.192,59.913 101.687,59.913 v2(101.7,59.9) ; v2(117.6,66) 112.2,71.4 112.2,92.15 123.1,103.05 123.1,112.76 P2.42
  Bottom Layer w0.254: v2(101.7,59.9) 103.5,61.7 110.6,61.7 114.9,66 v2(117.6,66)
LCD_HSYNC-FPC_PIN11: P1.12 P2.40 | length 97.7
  Top Layer w0.254: P2.40 120.6,112.72 120.6,102.15 111.1,92.65 111.1,70.2 120,61.3 v2(120,52.2)
  Bottom Layer w0.254: P1.12 113.04,45.2 124,45.2 125.2,46.4 125.2,49.3 124.2,50.3 119.8,50.3 119.3,50.8 119.3,51.5 v2(120,52.2)
LCD_MODE-FPC_PIN8: P1.9 P2.43 | length 95.7
  Top Layer w0.254: P1.9 106.62,44 120,44 121.7,45.7 121.7,63.4 112.8,72.3 112.8,91.85 124.4,103.45 P2.43
LCD_NRESET-FPC_PIN44: P1.14 P2.7 R2.1 | length 120.9
  Top Layer w0.16: R2.1 78.68,108.53 P2.7
  Top Layer w0.254: v2(103.775,68.7) 103.775,66.975 115.32,55.43 P1.14
  Bottom Layer w0.254: P2.7 80,112.78 80,116 80.9,116.9 111.3,116.9 112.9,115.3 112.9,73.6 107.3,68 104.475,68 v2(103.775,68.7)
LCD_PCLK-FPC_PIN37: P1.13 U1.15 | length 14.7
  Top Layer w0.254: U1.15 109.325,57.975 112.78,54.52 P1.13
LCD_PCLK-FPC_PIN37_CONN: P2.14 U1.5 | length 97.4
  Top Layer w0.254: P2.14 87.5,112.8 87.5,110.6 89.2,108.9 99.7,108.9 100.2,108.4 107.625,108.4 109.075,106.95 115.85,106.95 116.125,106.675 116.125,103.025 106.85,93.75 106.85,93.675 ; U1.5 v2(101.5,58.625) ; 106.85,93.68 106.85,67.45 v2(110.6,63.7)
  Bottom Layer w0.254: v2(101.5,58.625) 100.5,59.625 100.5,60.225 102.725,62.45 109.35,62.45 v2(110.6,63.7)
LCD_SHLR-FPC_PIN39: P1.16 P2.12 R3.2 | length 107.4
  Top Layer w0.254: P2.12 83.76,116.41 R3.2@83.8,116.45 ; v2(105.625,68.8) 105.625,67.475 118.75,54.35 118.75,51.2 120.4,49.55 P1.16
  Bottom Layer w0.254: P2.12 85.86,116.1 109.8,116.1 110.45,115.45 110.45,109.55 112.3,107.7 112.3,75.475 v2(105.625,68.8)
LCD_UPDN-FPC_PIN40: P1.15 P2.11 R4.2 | length 106
  Top Layer w0.254: R4.2 83.755,109.005 83.755,111.455 P2.11 ; v2(104.7,69.775) 104.7,66.95 117.86,53.79 P1.15
  Bottom Layer w0.254: P2.11 85.1,112.8 85.1,114.5 85.9,115.3 107.5,115.3 107.9,114.9 107.9,110.8 111.5,107.2 111.5,76.575 v2(104.7,69.775)
LCD_VSYNC-FPC_PIN10: P1.11 P2.41 | length 99.1
  Top Layer w0.254: v2(120.4,51.3) 121,51.9 121,61.4 111.692,70.708 111.692,92.467 121.86,102.635 P2.41
  Bottom Layer w0.254: P1.11 111.3,44.4 124.5,44.4 126.2,46.1 126.2,49.5 124.4,51.3 v2(120.4,51.3)
NetC11_1: C11.1 IC1.5 | length 2.4
  Top Layer w0.254: C11.1 127.96,82.575 IC1.5
NetC17_1: C17.1 IC2.1 R10.2 R11.1 | length 34.2
  Top Layer w0.254: C17.1 74.894,76.636 R10.2 R11.1 76.419,75.261 75.169,75.261 v2(75.144,75.286) ; IC2.1 86.496,89.136 86.544,89.184 v2(86.544,90.086)
  Bottom Layer w0.254: v2(75.144,75.286) 75.144,79.586 71.9,82.83 71.9,85.242 74.044,87.386 85.144,87.386 86.544,88.786 v2(86.544,90.086)
NetC20_1: C20.1 IC2.18 | length 4.4
  Top Layer w0.254: IC2.18@92.244,85.236 93.936,85.236 94.7,86 C20.1
NetC20_2: C20.2 D3.2 D4.1 | length 8.5
  Top Layer w0.254: C20.2 99.6,86 101.275,84.325 D3.2 103.9,84.125 D4.1
NetC22_1: C22.1 D5.2 D6.1 | length 5.5
  Top Layer w0.254: D5.2 96.625,81.775 96.948,82.098 96.948,82.123 97.752,82.927 97.752,83.527 C22.1 98.225,83.9 99.1,83.025 D6.1
NetC22_2: C22.2 IC2.17 | length 4.4
  Top Layer w0.254: IC2.17@92.244,84.586 95.889,84.586 96.375,84.1 C22.2
NetC23_1: C23.1 IC2.20 Pot3.1 | length 13.3
  Top Layer w0.16: IC2.20 92.262,86.518 93.782,86.518 v2(93.8,86.5) ; C23.1 97.675,88.275 98.59,89.19 99.99,89.19 Pot3.1
  Bottom Layer w0.16: v2(93.8,86.5) 96.78,86.5 99.58,89.3 Pot3.1
NetC24_2: C24.2 D6.2 D7.1 | length 4.9
  Top Layer w0.254: D6.2 C24.2 99.2,76.625 99.8,76.025 D7.1
NetC25_1: C25.1 D7.2 D8.1 | length 4.1
  Top Layer w0.254: D7.2 103.827,79.175 104.1,78.902 C25.1
NetC25_2: C25.2 D2.1 IC2.5 IC2.6 L2.2 | length 33.1
  Top Layer w0.254: v2(87.725,80.85) 88.294,80.281 88.466,80.281 88.95,79.797 88.95,73.875 90.725,72.1 103.35,72.1 104.175,72.925 104.175,75.3 C25.2
  Bottom Layer w0.254: v2(84.975,86.4) 87.75,83.625 87.75,80.875 v2(87.725,80.85)
NetC26_2: C26.2 D8.2 IC2.16 P7.2 R14.1 | length 76.4
  Top Layer w0.16: IC2.16@92.244,83.936 93.368,83.936 93.417,83.984 94.25,83.984 95.45,82.784 95.45,81.25 95.975,80.725 96.85,80.725 ; R14.1 93.6,77.475 96.85,80.725 ; D8.2 103.775,82.375 102.125,80.725 96.85,80.725
  Top Layer w0.254: C26.2 88.635,105.54 P7.2 ; D8.2 v2(105.2,82.375)
  Bottom Layer w0.254: P7.2 95.36,109.5 108.2,109.5 110.9,106.8 110.9,85.7 107.575,82.375 v2(105.2,82.375)
NetC27_1: C27.1 IC2.22 | length 4.7
  Top Layer w0.16: IC2.22@92.244,87.836 93.336,87.836 94.3,88.8 C27.1
NetC27_2: C27.2 R16.1 | length 1.8
  Top Layer w0.16: C27.2 94.3,94.25 R16.1@94.4,94.35
NetC28_1: C28.1 IC2.24 | length 2.1
  Top Layer w0.16: IC2.24@92.244,89.136 92.244,91.119 C28.1
NetC29_1: C29.1 IC2.14 | length 2.5
  Top Layer w0.16: IC2.14@92.244,82.636 93.264,82.636 C29.1
NetC30_2: C30.2 IC2.2 | length 15.8
  Top Layer w0.254: v2(82.944,100.886) 84.221,100.886 C30.2 ; v2(84.644,89.286) 84.678,89.286 85.43,88.534 86.396,88.534 IC2.2
  Bottom Layer w0.16: v2(82.944,100.886) 83.644,100.186 83.644,90.286 v2(84.644,89.286)
NetC31_2: C31.2 IC2.3 | length 14.9
  Top Layer w0.254: v2(82.944,99.186) 84.221,99.186 C31.2 ; v2(84.644,88.286) 84.764,88.286 85.214,87.836 IC2.3
  Bottom Layer w0.16: v2(82.944,99.186) 82.944,89.986 v2(84.644,88.286)
NetC33_1: C33.1 IC2.11 Pot4.1 R17.2 | length 17.1
  Top Layer w0.254: Pot4.1 86.764,69.306 88.144,70.686 88.144,74.786 85.744,77.186 R17.2 C33.1 84.944,80.44 84.944,81.975 85.557,82.588 86.396,82.588 IC2.11
NetC34_1: C34.1 IC3.1 P7.1 | length 4.6
  Top Layer w0.254: P7.1 92.304,103.904 C34.1 93.823,103.954 IC3.1
NetD1_1: D1.1 IC1.3 L1.2
NetIC1_2: IC1.2 P3.2 R6.1 | length 12.6
  Top Layer w0.254: P3.2 R6.1 v2(127.95,69.5) ; v2(127.95,77) 127.955,77.005 127.955,78.045 IC1.2
  Bottom Layer w0.254: v2(127.95,69.5) v2(127.95,77)
NetIC1_6: IC1.6 Pot1.2 R5.2 | length 20.1
  Top Layer w0.254: Pot1.2 118.9,91.48 120.8,89.58 120.8,83.4 121.4,82.8 126.3,82.8 ; R5.2 126.3,82.8 ; IC1.6 127.01,81.19 126.3,81.9 126.3,82.8
NetIC2_12: IC2.12 R14.2 R15.1 | length 13.7
  Top Layer w0.16: IC2.12 87.839,81.986 89.525,80.3 89.525,76.425 90.675,75.275 R15.1 91.9,74.15 92.7,73.35 R14.2
NetIC2_21: IC2.21 R12.2 R13.1 | length 14.9
  Top Layer w0.16: IC2.21 100.211,87.186 103.575,90.55 R12.2 103.825,90.55 104.68,91.405 104.68,91.605 104.975,91.9 R13.1
NetIC3_3: IC3.3 R20.2 R21.2 | length 3.1
  Top Layer w0.254: R20.2 R21.2 IC3.3
NetIC3_4: IC3.4 Pot5.2 Pot5.3 R18.1 | length 8.5
  Top Layer w0.254: IC3.4 99.646,102.054 99.7,102 ; R18.1 99.7,102 ; Pot5.2 Pot5.3 101.2,100.02 99.7,101.52 99.7,102
NetP3_3: P3.3 R22.1 | length 2.7
  Top Layer w0.254: P3.3 R22.1
NetP4_2: P4.2 R5.1 R7.1 R8.2
NetPot1_CCW: Pot1.3 R9.1 | length 4.1
  Top Layer w0.254: R9.1 115,90.12 116.36,91.48 Pot1.3
NetPot1_CW: Pot1.1 R7.2 | length 4.6
  Top Layer w0.254: Pot1.1 121.44,92.431 122.284,93.275 R7.2
NetPot2_CW: Pot2.2 Pot2.3 R11.2 | length 6.5
  Top Layer w0.254: R11.2 76.569,73.736 77.359,72.946 Pot2.2 Pot2.3
NetPot3_CW: Pot3.2 Pot3.3 R13.2 | length 7.9
  Top Layer w0.16: Pot3.2 Pot3.3 100.62,94.38 101.6,93.4 R13.2
NetQ1_1: Q1.1 Q2.1 R1.1 S1.2 | length 15.5
  Top Layer w0.16: v2(81.6,52.7) 82.75,52.7 Q2.1 82.8,53.391 83.159,53.75 85.75,53.75 86.75,52.75 Q1.1 87,52.55 R1.1
  Bottom Layer w0.16: S1.2 74.697,52.803 81.497,52.803 v2(81.6,52.7)
VCOM: C32.2 IC2.10 P2.5 P2.45 TP2.1 | length 122.2
  Top Layer w0.254: TP2.1 C32.2 76.14,108.44 P2.5 ; v2(82.85,78.35) 84.325,79.825 84.325,82.475 85.136,83.286 IC2.10
  Bottom Layer w0.254: TP2.1 76.1,91.7 71.2,86.8 71.2,82.2 72.8,80.6 72.8,75 73.9,73.9 76,73.9 77.1,75 77.1,76 78.3,77.2 81.7,77.2 v2(82.85,78.35)
  Bottom Layer w0.5: P2.5 74.886,112.714 74.886,117.286 76.1,118.5 113,118.5 114.7,116.8 121.5,116.8 123.146,115.154 123.146,113.254 123.686,112.714 125.686,112.714 P2.45
Vdd_3.3V: P1.1 P1.2 Q2.2 | length 7.3
  Top Layer w1: P1.1 P1.2 84.84,50.373 84.7,50.513 Q2.2
Vdd_5V: P1.3 P1.4 Q1.2 R1.2 | length 7.3
  Top Layer w1: P1.3 88.65,48 ; Q1.2 88.7,48.05 88.65,48 ; P1.4 88.65,48
Vdd_5V_LCD: C6.1 C7.1 C8.1 C12.1 C13.1 C14.1 C28.2 IC1.1 IC2.4 IC2.13 L1.1 L2.1 Q1.3 | length 154.3
  Top Layer w0.16: C12.1 83.819,96.786 85.033,98 v2(87.4,98) ; v2(90.5,98) 92.3,96.2 C28.2 ; v2(92.2,81.2) 92.2,81.942 IC2.13@92.244,81.986
  Top Layer w1: Q1.3 v4(87.75,56.5)
  Top Layer w1.5: v4(87.75,56.5) v4(89.996,56.5)
  Bottom Layer w0.16: v2(87.4,98) v2(90.5,98) ; v4(87.75,56.5) 87.75,56.863 88.1,57.213 88.1,75.1 92.2,79.2 v2(92.2,81.2)
  Bottom Layer w1: 68.1,86 67.7,85.6 67.7,79.1 68.2,78.6
  Bottom Layer w2: 68.1,86 69.1,87 69.1,90.6 73.5,95 v4(73.5,95.5) v4(73.5,97.2) ; 68.2,78.6 68.2,66.6 73.7,61.1 83.15,61.1 v4(87.75,56.5) v4(89.996,56.5) 95.496,51 113,51 121.5,59.5 v4(121.5,71.25) v4(121.5,73)
VGH_18V-FPC_PIN41: C35.2 IC3.5 P2.10 R18.2 R19.2 TP3.1 | length 45.5
  Top Layer w0.254: P2.10 82.475,112.745 82.475,108.6 83.075,108 86.6,108 86.95,108.35 99.425,108.35 99.9,107.875 105.525,107.875 106.417,106.983 106.417,106 ; IC3.5 98.979,103.954 99.575,104.55 R18.2 99.7,105.4 100.2,105.9 C35.2 104.4,105.9 ; R19.2 104.4,105.9 ; TP3.1 106.417,104.143 106.417,106 ; 104.4,105.9 106.317,105.9 106.417,106
VGL_-6V-FPC_PIN42: C21.1 D3.1 P2.9 R12.1 TP1.2 | length 68.4
  Top Layer w0.254: TP1.2 80.575,104.225 C21.1 81.22,104.87 81.22,107.275 ; P2.9 81.22,107.275 ; D3.1 R12.1 104.45,89.05 106.3,90.9 106.3,93.975 115.575,103.25 115.575,106.1 115.275,106.4 108.907,106.4 108.532,106.775 v2(107.6,106.775) ; v2(105.375,106.775) 104.8,107.35 99.675,107.35 99.2,107.825 87.275,107.825 86.725,107.275 81.22,107.275
  Bottom Layer w0.254: v2(105.375,106.775) v2(107.6,106.775)
VLED+: C9.1 C10.1 D1.2 P2.49 P2.50 | length 32.1
  Top Layer w1.5: P2.50 132.02,94.38 132.96,93.44 D1.2
VLED-: P2.47 P2.48 P4.1 | length 21.1
  Top Layer w1.5: P4.1 128,97.5 129.48,98.98 P2.48
pads on no net: IC2.23 P2.1 P2.2 P2.6 S1. S1.1

## Polygon pours and split planes (outlines as drawn)
AVDD_9.6V-FPC_PIN43 on Top Layer "AVDD_9.6V-FPC_PIN43_L01_P002" (solid, pour order 2): 80.944,83.786 79.744,82.586 76.944,82.586 76.344,81.986 69.444,81.986 69.444,78.086 81.144,78.086 83.844,80.786 83.844,83.786
NetC25_2 on Top Layer "NETC25_2_L01_P004" (solid, pour order 4): 74.644,91.586 74.644,85.386 76.344,85.386 76.969,84.761 76.969,83.936 77.319,83.586 79.244,83.586 79.844,84.186 79.844,85.886 80.219,86.261 84.494,86.261 85.069,85.686 86.344,85.686 86.344,86.786 83.869,86.786 81.769,88.886 81.769,90.261 80.444,91.586
Vdd_5V_LCD on Top Layer "VDD_5V_LCD_L01_P005" (solid, pour order 5): 86.444,87.486 84.444,87.486 83.944,87.986 83.944,89.586 84.344,89.986 84.344,98.186 72.5,98.186 72.5,91.936 80.494,91.936 82.044,90.386 82.044,89.036 84.119,86.961 86.444,86.961
NetP4_2 on Top Layer "NETP4_2_L01_P006" (solid, pour order 6): 129.6,92 124,92 121.6,89.6 121.6,83.4 125.4,83.4 125.4,86 129.6,90.2
GND on Top Layer "GND_L01_P009" (solid, pour order 9): 137,41 67,41 67,121 137,121
NetD1_1 on Top Layer "NETD1_1_L01_P008" (solid, pour order 8): 128.625,79.125 128.625,71.075 129.8,69.9 133.9,69.9 135.025,71.025 135.025,79.375 134.525,79.875 131.025,79.875 130.275,79.125
Vdd_5V_LCD on Top Layer "VDD_5V_LCD_L01_P007" (solid, pour order 7): 127.3,79.1 118.8,79.1 118.8,69.9 127.3,69.9
GND on Bottom Layer "GND_L02_P003" (solid, pour order 3): 137,41 67,41 67,121 137,121

## Silkscreen, mask and mechanical layers (free items; w line width, h text height)
Top Overlay:
  text "ON" at 69.004,55.254 h1.5
  text "OFF" at 67.504,49.254 h1.5
Mechanical 1:
  the board outline again, w0.254

## Text inside footprints (layer, text, board x,y; h text height)
P2: Top Overlay "50" at 134.052,113.492 h1.27; Top Overlay "49" at 134.052,110.952 h1.27; Top Overlay "1" at 68.52,110.952 h1.27; Top Overlay "2" at 68.52,113.492 h1.27